# Altium PCB Audio_Meter_V3.2.PcbDoc (part 1 of 4)
Units mil, origin at the board's own origin, x right, y up, seen from the top; angles counter-clockwise.
Board outline 2756.14 x 2519.69 mil, 2 copper layers (Top Layer, Bottom Layer), stack 57 mil thick; 102 components, 57 nets, 306 pads, 131 vias.
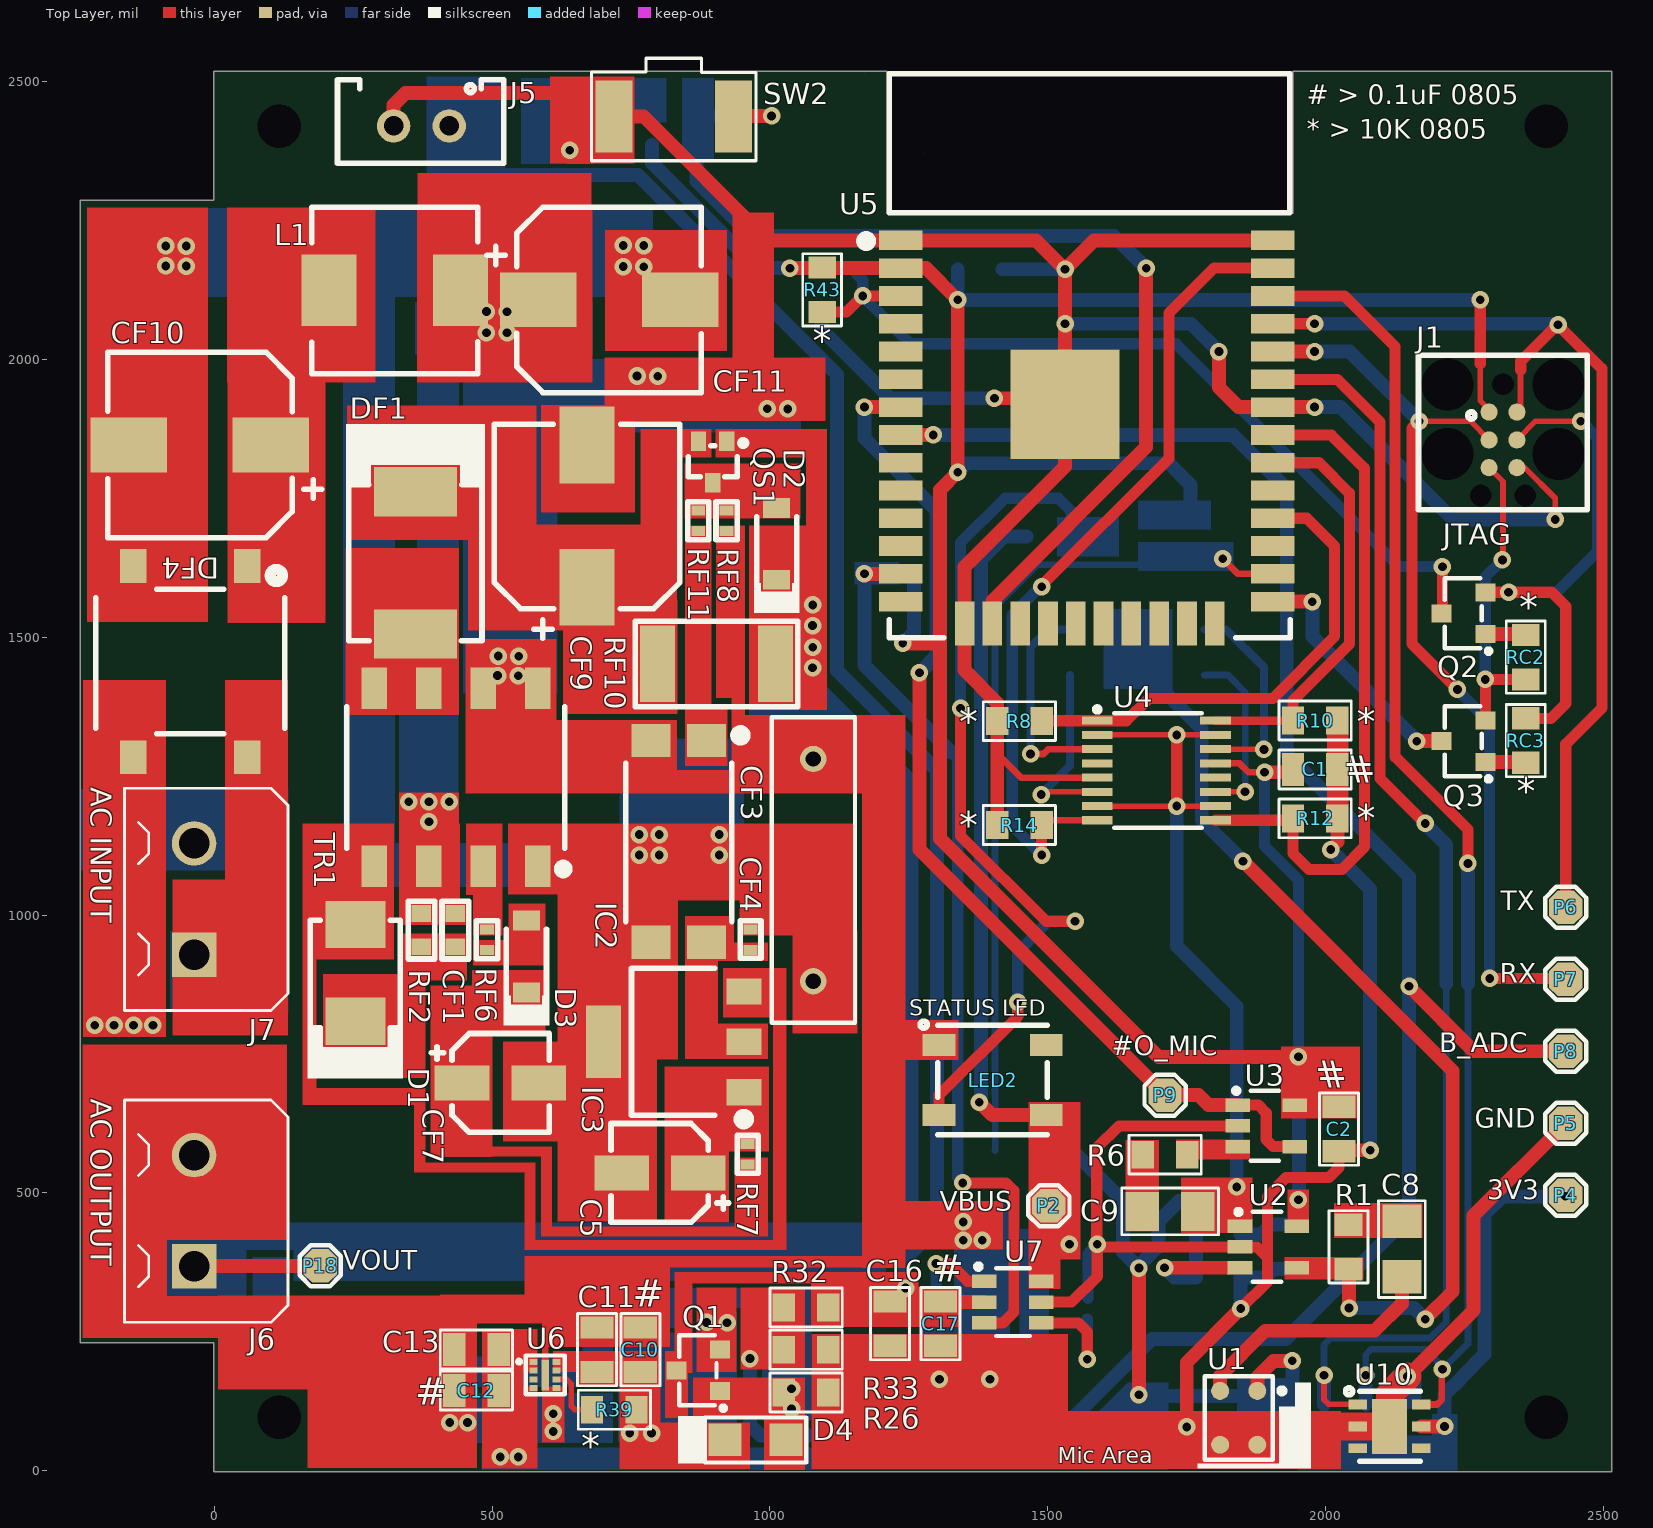
[diagram p0: Top Layer view]
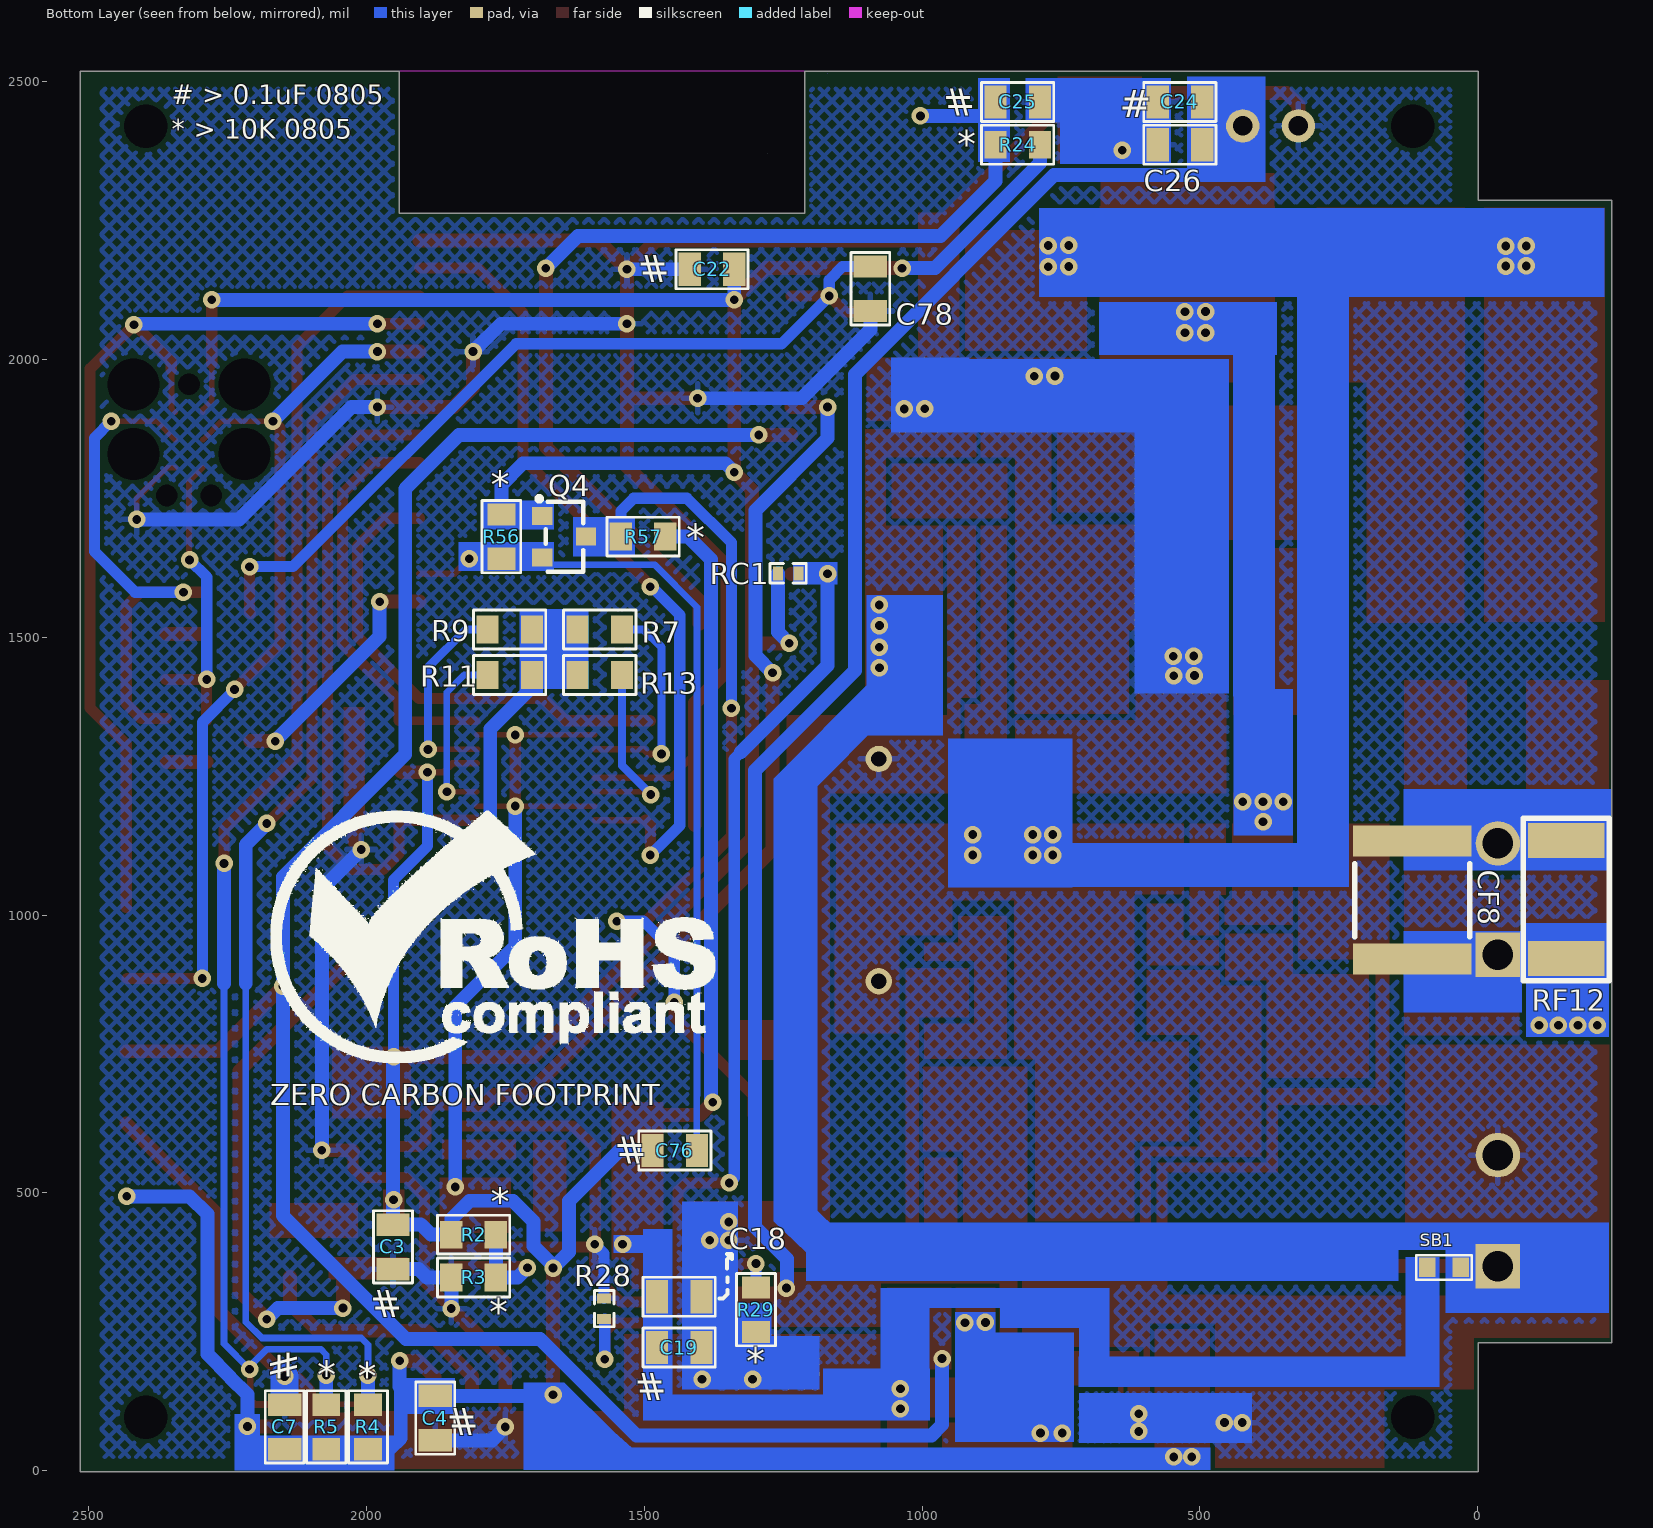
[diagram p1: Bottom Layer view, seen from below]
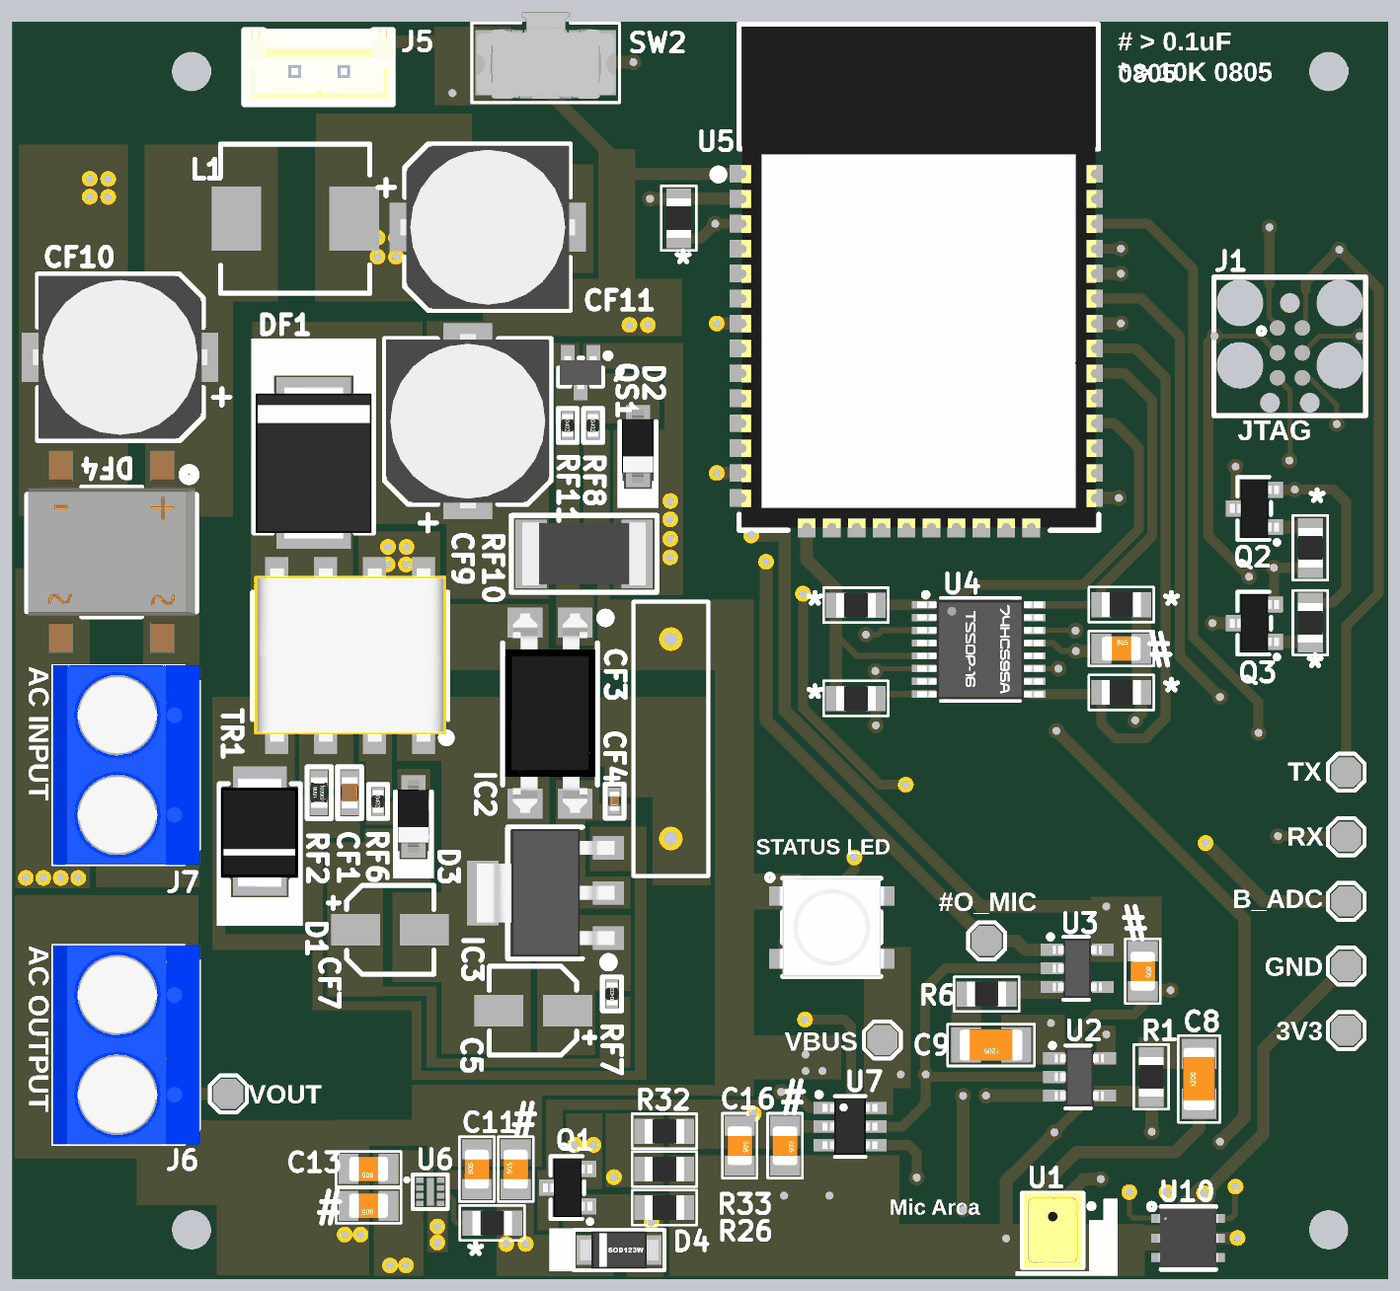
[diagram p3: 3D render of the assembled board from above, using the file's embedded part models]
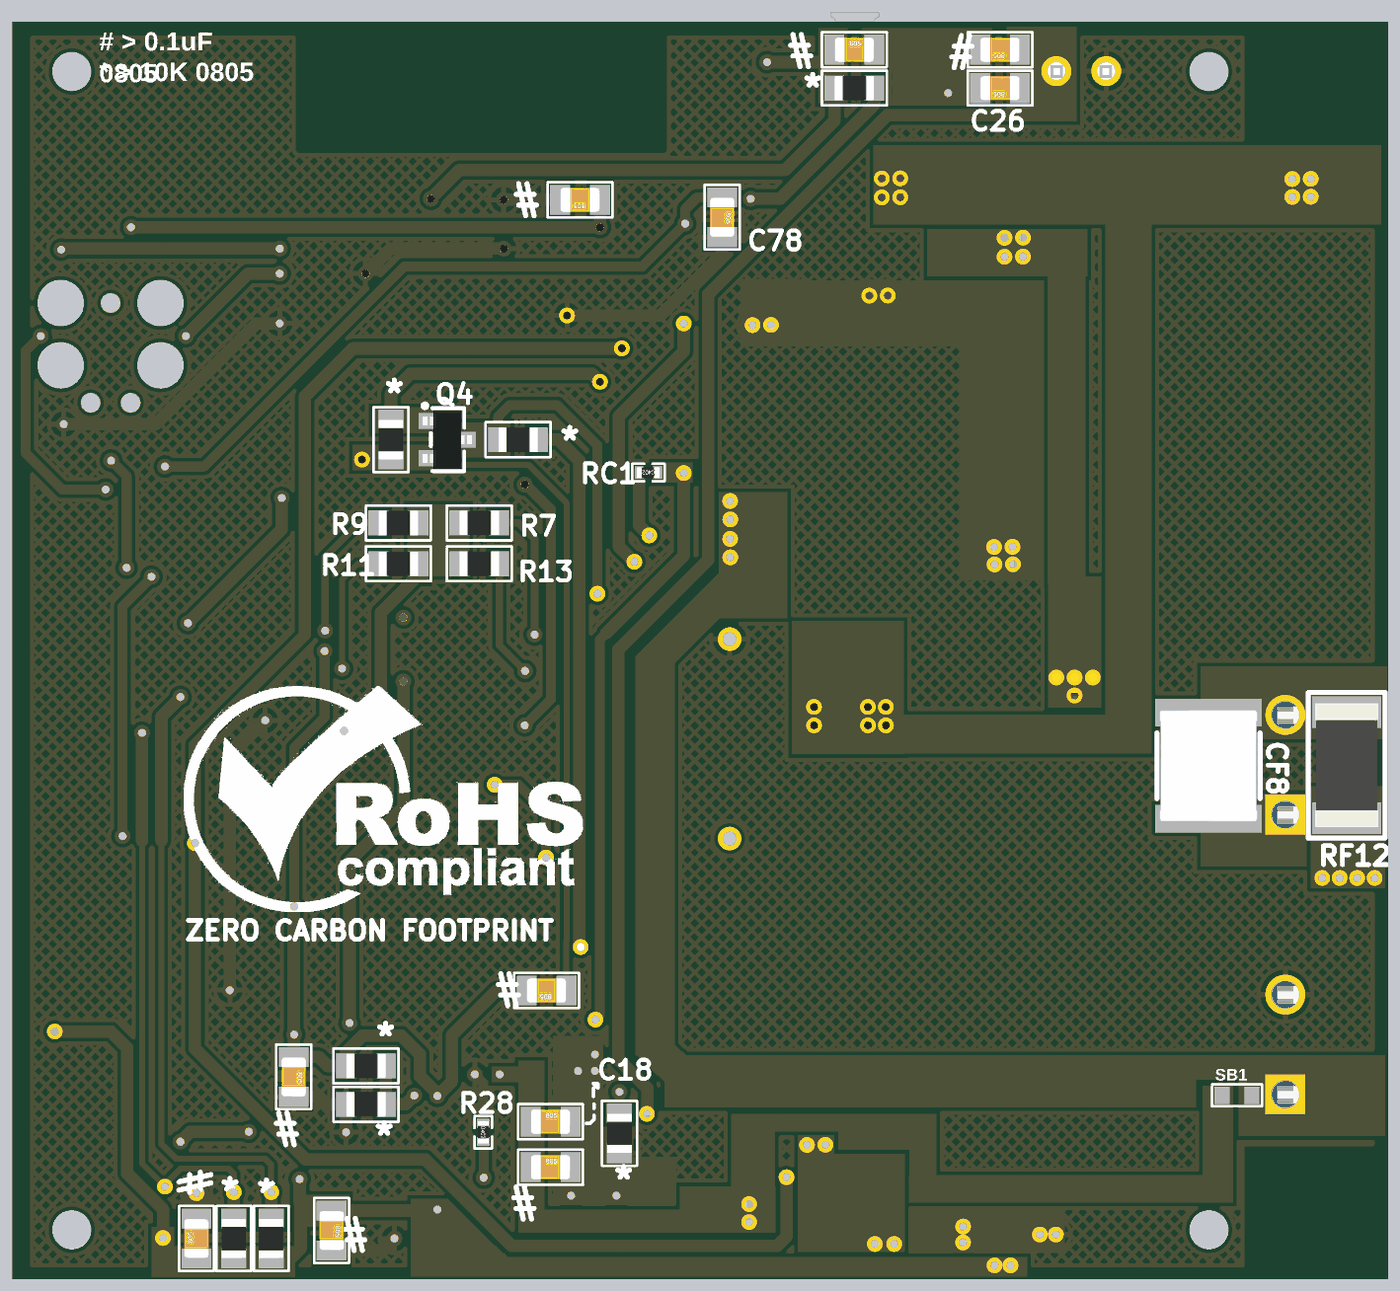
[diagram p4: 3D render of the assembled board from below, using the file's embedded part models]

## Layer stack, top to bottom
Top Solder: solder mask 3, Solder Resist, Dk 3.5
Top Layer: signal copper 10
Dielectric 1: dielectric 37, FR-4, Dk 4.8
Bottom Layer: signal copper 10
Bottom Solder: solder mask 3, Solder Resist, Dk 3.5

## Board outline
-241.16,230.28 -1,230.28 -1,-1.69 2514.98,-1.68 2514.98,2518 1941,2518 1941,2263 1211,2263 1211,2518 -1,2518 -1,2286.03 -241.16,2286.03
cut-out: 1941,2263 1211,2263 1211,2518 1941,2518
cut-out: 1279,2370
cut-out: 1169.36,2514

## Design rules (kind name [scope] priority, off if disabled: settings)
Clearance [All] p1: gap=7 ignorepadtopadclearanceinfootprint=FALSE except(3: Arc-SMDPad Track-SMDPad SMDPad-SMDPad)
HoleSize [All] p1: absolutevalues=TRUE maxlimit=1000 minlimit=1 maxpercent=80.000 minpercent=20.000
HoleToHoleClearance [All] p1: gap=5 allowstackedmicrovias=TRUE
MinimumSolderMaskSliver [All] p1: minsoldermaskwidth=0
PolygonConnect [All] p1: connectstyle=Relief reliefconductorwidth=10 reliefentries=4 polygonreliefangle="90 Angle" airgapwidth=10
RoutingVias [All] p1: holewidth=15.75 width=31.5 viastyle="Through Hole" minholewidth=15.75 minwidth=31.5 maxholewidth=15.75 maxwidth=31.5
SilkToSilkClearance [All] p1: silktosilkclearance=0
SilkToSolderMaskClearance [IsPad] p1: minsilkscreentomaskgap=0 clearancetoexposedcopper=TRUE
SolderMaskExpansion SolderMaskExpansion_1 [IsVia] p1: expansion=4 soldermaskfromhole=TRUE
SolderMaskExpansion [not IsVia] p2: expansion=4
Width [All] p1: maxlimit=50 minlimit=10 preferedwidth=15 minimp=50.000000 maximp=50.000000 favimp=50.000000
25 further rules are at their usual default settings.

## Classes and differential pairs
component class U_SMPS_Section: C5 CF1 CF3 CF4 CF7 CF8 CF9 CF10 CF11 D1 D2 D3 DF1 DF4 IC2 IC3 L1 QS1 RF2 RF6 RF7 RF8 RF10 RF11 RF12 TR1
component class U_Sensor_Section: C7 R4 R5 U10
component class U_Power_Section: C10 C11 C12 C13 D4 LED2 Q1 R26 R39 U6
component class U_Controller_Section: C22 C25 C76 C78 Q2 Q3 Q4 R24 R43 R56 R57 RC2 RC3 SW2 U5
component class U_Connector_Section: C24 C26 J1 J5 J6 J7 P2 P4 P5 P6 P7 P18 SB1
component class "U_Battery Charging_Section": C16 C17 C18 C19 P8 R28 R29 R32 R33 RC1 U7
component class U_Audio_Section: C1 C2 C3 C4 C8 C9 C21 P9 R1 R2 R3 R6 R7 R8 R9 R10 R11 R12 R13 R14 U1 U2 U3 U4

## Components (designator, comment, footprint, x,y, rotation, side; value= is the part's Value field where it differs from the comment)
C1 "0.1uF" Cap0805 1981,1262 r0 top
C2 "0.1uF" Cap0805 2024,615 r270 top
C3 "0.1uF" Cap0805 1952,403 r270 bottom
C4 "0.1uF" Cap0805 1876,95 r270 bottom
C5 "10uF" EEE-1EA100WR 802.1,536 r180 top
C7 "0.1uF" Cap0805 2147,79 r90 bottom
C8 "1206YC105K4T2A" Cap1206 2137,399 r90 top
C9 "1206YC105K4T2A" Cap1206 1720,467 r180 top
C10 "0.1uF" Cap0805 767,218 r90 top
C11 "1uF" Cap0805 689,218 r90 top
C12 "0.1uF" Cap0805 472,144.62 r180 top
C13 "1uF" Cap0805 472,218.5 r180 top
C16 "1uF" Cap0805 1216,265 r270 top
C17 "0.1uF" Cap0805 1307,265 r270 top
C18 "1uF" Cap0805 1437,313.3 r180 bottom
C19 "0.1uF" Cap0805 1437,222 r180 bottom
C22 "0.1uF" Cap0805 1378,2162 r0 bottom
C24 "0.1uF" Cap0805 536,2463 r0 bottom
C25 "0.1uF" Cap0805 828,2463 r180 bottom
C26 "4.7UF" Cap0805 536,2386 r0 bottom
C76 "0.1uF" Cap0805 1445,576.37 r0 bottom
C78 "1uF" Cap0805 1093,2127 r270 bottom
CF1 "1000pF" Cap0603 434,973 r270 top
CF3 "1nF" RAD-0.4 1078,1081 r90 top locked
CF4 "1nF" Cap0402 965,956 r90 top
CF7 "10uF" EEE-1EA100WR 515,698 r0 top
CF8 "4700pF" CAP-2220 118,1027 r90 bottom
CF9 "1000uF" UWT0J102MNL1GS 671,1717.95 r90 top
CF10 "4.7uF" ULR2G4R7MNL1GS -26,1846 r180 top
CF11 "4.7uF" ULR2G4R7MNL1GS 710.95,2107 r0 top
D1 "MURS160T3G" SMB 254,896 r270 top
D2 "MMSZ5229BT1" SOD-123 1012,1668 r270 top
D3 "MMSD4148T1G" SOD-123 562,925.57 r270 top
D4 "PMEG3010ER,115" PMEG3010ER,115 1029.24,56 r180 top
DF1 "MBRS360T3G" SMC 362,1633.95 r90 top
DF4 "DF04S-T" DF04S-T -43,1456 r0 top
IC2 "SFH615A-4X018T" SFH615A-4X018T 836,1132.5 r270 top
IC3 "NCP1014ST100T3G" SOT-223 827,772 r90 top
J1 "TC2030-IDC" TC2030-IDC 2319,1855 r270 top
J5 "B2B-EH-A(LF)(SN)" B2B-EH-A(LF)(SN) 373,2420 r180 top locked
J6 "Terminal Block 2POS" "Terminal Block 2P" -36,368 r90 top locked
J7 "Terminal Block 2POS" "Terminal Block 2P" -36,929 r90 top locked
L1 "820uH" DR74-821-R 325,2124 r0 top
LED2 "1655" 1655 1400.61,703.01 r0 top
P2 "TEST POINT" "TEST POINT" 1502,477 r0 top
P4 "TEST POINT" "TEST POINT" 2432,496 r0 top
P5 "TEST POINT" "TEST POINT" 2432,625.5 r0 top
P6 "TEST POINT" "TEST POINT" 2432,1014 r0 top
P7 "TEST POINT" "TEST POINT" 2432,884.5 r0 top
P8 "TEST POINT" "TEST POINT" 2432,755 r0 top
P9 "TEST POINT" "TEST POINT" 1711,676 r0 top
P18 "TEST POINT" "TEST POINT" 191,369 r270 top
Q1 "DMP2045U-7" SOT-23 871,181 r90 top
Q2 "MMBT2222A-7-F" SOT-23 2248,1543 r90 top
Q3 "MMBT2222A-7-F" SOT-23 2248,1313 r90 top
Q4 "BSS138LT1G" SOT-23 1644,1681 r270 bottom
QS1 "MMBT2907AWT1G" "SC-70-3 (SOT323)" 897,1815.4 r180 top
R1 "1K" RES0805 2041,403 r270 top
R2 "10K" RES0805 1807,425 r0 bottom
R3 "10K" RES0805 1807,348 r0 bottom
R4 "10K" RES0805 1997,79 r270 bottom
R5 "10K" RES0805 2072,79 r270 bottom
R6 "1K" RES0805 1711,569 r180 top
R7 "47K" RES0805 1580,1514 r0 bottom locked
R8 "10K" RES0805 1449,1349 r0 top
R9 "100K" RES0805 1742,1514 r180 bottom locked
R10 "10K" RES0805 1981,1350 r180 top
R11 "220K" RES0805 1742,1432 r180 bottom locked
R12 "10K" RES0805 1981,1174 r180 top
R13 "470K" RES0805 1580,1432 r0 bottom locked
R14 "10K" RES0805 1449,1162 r0 top
R24 "10K" RES0805 828,2386 r180 bottom
R26 "100K" RES0805 1065,141 r180 top
R28 "665R" Res0402 1572,292 r270 bottom
R29 "10K" RES0805 1299,290 r90 bottom
R32 "1M" RES0805 1065,294 r0 top
R33 "1M" RES0805 1065,218 r0 top
R39 "10K" RES0805 720,110 r0 top
R43 "10K" RES0805 1094,2125 r90 top
R56 "10K" RES0805 1757,1681 r270 bottom
R57 "10K" RES0805 1502,1681 r0 bottom
RC1 "10K" Res0402 1241,1615 r0 bottom
RC2 "10K" RES0805 2360,1464 r90 top
RC3 "10K" RES0805 2360,1314 r270 top
RF2 "150K" Res0603 373,973 r90 top
RF6 "10R" Res0402 491,955.5 r270 top
RF7 "2K" Res0402 960,569.5 r90 top
RF8 "200R" Res0402 922,1709.5 r270 top
RF10 "0.62R" "RES 2512" 904,1452 r0 top
RF11 "68R" Res0402 871,1709.5 r270 top
RF12 "18R" "RES 2512" -159,1028 r270 bottom
SB1 "Solder Bridge" "Solder Bridge" 61,366 r180 bottom
SW2 "Switch" KSS221GLFS 827,2437 r180 top locked
TR1 "750311558" 750311558 435,1248 r270 top
U1 "SPU0410HR5H-PB" SPU0410HR5H-PB 1810.07,144 r0 top locked
U2 "OPA344NA/250" SOT23-5 1897,403 r0 top
U3 "OPA344NA/250" SOT23-5 1893,620.86 r0 top
U4 "ADG712BRUZ-REEL" 16-TSSOP 1698.3,1260.23 r0 top
U5 "ESP32-WROOM-32 (16MB)" "ESP32-WROOM-32 (16MB)" 1570,1869.31 r0 top locked
U6 "NCP186AMX330TAG" NCP186AMX330TAG 595.67,172.62 r0 top
U7 "BQ21040DBVR" SOT-23-6 1437,303.6 r0 top
U10 "SI7021-A20-GM1R" SI7021-A20-GM1R 2115.09,80 r0 top

## Footprints (in the part's own frame and the unit in brackets; to place one, negate y for a bottom-side part, rotate by r counter-clockwise, add the part's x,y. Pads: shape width x height; smd on the part's side, far side on the other; paste and mask are expansions set on the pad)
16-TSSOP [mm]
  rect 1.4x0.37 smd: 1(-2.775,2.275) 2(-2.775,1.625) 3(-2.775,0.975) 4(-2.775,0.325) 5(-2.775,-0.325) 6(-2.775,-0.975) 7(-2.775,-1.625) 8(-2.775,-2.275) 9(2.625,-2.275) 10(2.625,-1.625) 11(2.625,-0.975) 12(2.625,-0.325) 13(2.625,0.325) 14(2.625,0.975) 15(2.625,1.625) 16(2.625,2.275)
  silkscreen extent -2.89,-2.62 2.01,2.9, body extent -3.2,-2.55 3.2,2.55, height 1.2
1655 [mm]
  rect 1.5x1 smd: 1(-2.45,1.6) 2(-2.45,-1.6) 3(2.45,-1.6) 4(2.45,1.6)
  silkscreen extent -3.31,-2.5 2.5,2.7, body extent -2.7,-2.5 2.7,2.5, height 1.58
750311558 [mm]
  rect 1.91x1.17 smd: 1(4.065,3.735) 2(4.065,1.245) 3(4.065,-1.245) 4(4.065,-3.735) 5(-4.065,-3.735) 6(-4.065,-1.245) 7(-4.065,1.245) 8(-4.065,3.735)
  silkscreen extent -3.23,-4.98 4.37,5.08, body extent -4.42,-4.88 4.38,4.9, height 10.09
B2B-EH-A(LF)(SN) [mil]
  round 60 hole 35.43: 1(-50,0) 2(50,0)
  silkscreen extent -148,-83 151,67, body extent -148,-86 148,64, height 244
Cap0402 [mil]
  rect 18x25 smd: 1(-18.5,0) 2(18.5,0)
  silkscreen extent -34,-19 34,19, body extent -20,-10 20,10, height 19
Cap0603 [mil]
  rect 30x35 smd: 1(30,0) 2(-30,0)
  silkscreen extent -52,-24 52,24, body extent -31,-16 32,16, height 34
Cap0805 [mil] "SMD 0805"
  rect 40x60 smd: 1(-40,0) 2(40,0)
  silkscreen extent -65,-35 65,35, body extent -39,-25 39,25, height 30
Cap1206 [mil] "SMD 1206"
  rect 60x70 smd: 1(-50,0) 2(50,0)
  silkscreen extent -87,-42 87,42, body extent -63,-31 63,32, height 39
CAP-2220 [mm]
  rect 1.41x5.41 smd: 1(-2.699,0) 2(2.699,0)
  silkscreen extent -1.67,-2.62 1.67,2.62, body extent -2.85,-2.5 2.85,2.5, height 2
DF04S-T [mm]
  rect 1.22x1.54 smd: 1(2.6,4.37) 2(2.6,-4.37) 3(-2.6,4.37) 4(-2.6,-4.37)
  silkscreen extent -4.32,-3.3 4.32,4.22, body extent -4.25,-5.15 4.26,5.15, height 3.55
DR74-821-R [mm]
  rect 2.52x3.27 smd: 1(-3,0) 2(3,0)
  silkscreen extent -3.8,-3.8 3.8,3.8
EEE-1EA100WR [mm]
  rect 2.5x1.6 smd: 1(-1.75,0) 2(1.75,0)
  silkscreen extent -3.15,-2.26 2.24,2.26, body extent -2.5,-2.15 2.5,2.15, height 5.8
"ESP32-WROOM-32 (16MB)" [mm]
  rect 2x0.9 smd: 1(-8.5,8.755) 2(-8.5,7.485) 3(-8.5,6.215) 4(-8.5,4.945) 5(-8.5,3.675) 6(-8.5,2.405) 7(-8.5,1.135) 8(-8.5,-0.135) 9(-8.5,-1.405) 10(-8.5,-2.675) 11(-8.5,-3.945) 12(-8.5,-5.215) 13(-8.5,-6.485) 14(-8.5,-7.755) 25(8.5,-7.755) 26(8.5,-6.485) 27(8.5,-5.215) 28(8.5,-3.945) 29(8.5,-2.675) 30(8.5,-1.405) 31(8.5,-0.135) 32(8.5,1.135) 33(8.5,2.405) 34(8.5,3.675) 35(8.5,4.945) 36(8.5,6.215) 37(8.5,7.485) 38(8.5,8.755)
  rect 0.9x2 smd: 15(-5.58,-8.755) 16(-4.31,-8.755) 17(-3.04,-8.755) 18(-1.77,-8.755) 19(-0.5,-8.755) 20(0.77,-8.755) 21(2.04,-8.755) 22(3.31,-8.755) 23(4.58,-8.755) 24(5.85,-8.755)
  rect 5x5 smd: 39(-0.991,1.27)
  silkscreen extent -10.28,-9.4 9.3,16.38, body extent -8.91,-9.3 9.16,16.24, height 3.01
KSS221GLFS [mil] "Tactile Switch SPST-NO Side Actuated Surface Mount, Right Angle"
  rect 66.93x130 smd: 1(-107.3,0) 2(107.3,0)
  silkscreen extent -148,-105 148,80, body extent -138,-101 138,72, height 65
NCP186AMX330TAG [mm]
  rect 0.37x0.28 smd: 1(-0.525,0.6) 2(-0.525,0.2) 3(-0.525,-0.2) 4(-0.525,-0.6) 5(0.525,-0.6) 6(0.525,-0.2) 7(0.525,0.2) 8(0.525,0.6)
  rect 0.35x1.4 smd: 9(0,0)
  silkscreen extent -1.27,-0.89 0.89,0.89
PMEG3010ER,115 [mm] "DIODE SCHOTTKY 30V 1A SOD123W"
  rect 1.5x1.5 smd: A(0,0) K(2.8,0)
  silkscreen extent -0.91,-1.09 4.95,1.09, body extent -0.6,-0.95 3.4,0.95, height 1.1
RAD-0.4 [mm] "Radial Cap, Thru-Hole; 2 Leads; 0.4 in Pin Spacing"
  round 1.2 hole 0.7: 1(-5.08,0) 2(5.08,0)
  silkscreen extent -6.98,-1.91 6.98,1.91
Res0402 [mil]
  rect 18x25 smd: 1(-18.5,0) 2(18.5,0)
  silkscreen extent -32,-18 32,18, body extent -23,-11 23,11, height 16
Res0603 [mil]
  rect 30x35 smd: 1(30,0) 2(-30,0)
  silkscreen extent -52,-24 52,24, body extent -31,-17 31,17, height 18
RES0805 [mil] "Resistor-SMD-0805"
  rect 40x50 smd: 1(-40,0) 2(40,0)
  silkscreen extent -65,-35 65,35, body extent -39,-25 39,24, height 24
"RES 2512" [mm] "RES SMD (2512)"
  rect 1.6x3.5 smd: 1(-2.7,0) 2(2.7,0)
  silkscreen extent -3.71,-1.96 3.71,1.96, body extent -3.15,-1.6 3.15,1.6, height 0.71
"SC-70-3 (SOT323)" [mm]
  rect 0.7x0.9 smd: 1(-0.65,-0.95) 2(0.65,-0.95) 3(0,0.95)
  silkscreen extent -1.42,-0.89 1.12,0.69, body extent -1.05,-1.05 1.05,1.05, height 0.88
SFH615A-4X018T [mm]
  rect 1.52x1.78 smd: 1(-4.61,1.27) 2(-4.61,-1.27) 3(4.61,-1.27) 4(4.61,1.27)
  silkscreen extent -5.07,-2.41 3.66,3.04, body extent -5.08,-2.3 5.08,2.3, height 3.84
SI7021-A20-GM1R [mm]
  rect 0.85x0.45 smd: 1(-1.45,1) 2(-1.45,0) 3(-1.45,-1) 4(1.45,-1) 5(1.45,0) 6(1.45,1)
  rect 1.6x2.5 smd: 7(0,0)
  silkscreen extent -2.02,-1.6 1.4,1.76, body extent -1.5,-1.5 1.5,1.5, height 1.22
SMB [mil]
  rect 85x107.99 smd: 1(-87.01,0) 2(87.01,0)
  silkscreen extent -95,-86 190,86, body extent -107,-78 113,77, height 96
SMC [mm]
  rect 2.25x3.79 smd: 1(-3.25,0) 2(3.25,0)
  silkscreen extent -3.56,-3.18 6.35,3.17, body extent -3.9,-2.95 3.9,2.95, height 2.4
SOD-123 [mm]
  rect 0.91x1.22 smd: 1(-1.64,0) 2(1.64,0)
  silkscreen extent -1.24,-1.04 3.15,1.04, body extent -1.85,-0.8 1.85,0.8, height 1.27
"Solder Bridge" [mil] "Solder Bridge ON"
  rect 30x35 smd: 1(-30,0) 2(30,0)
  silkscreen extent -50,-22 50,22
SOT23-5 [mm] "SOT23-5 Package"
  rect 1.12x0.62 smd: 1(-1.3,0.95) 2(-1.3,0) 3(-1.3,-0.95) 4(1.3,-0.95) 5(1.3,0.95)
  silkscreen extent -1.48,-1.6 0.58,1.71, body extent -1.25,-1.5 1.25,1.5, height 1.09
SOT-23 [mm]
  rect 0.82x0.92 smd: 1(-0.95,-1) 2(0.95,-1) 3(0,1)
  silkscreen extent -1.82,-1.23 1.6,0.86, body extent -1.5,-1.25 1.5,1.25, height 1.1
SOT-23-6 [mm]
  rect 1.12x0.62 smd: 1(-1.3,0.95) 2(-1.3,0) 3(-1.3,-0.95) 4(1.3,-0.95) 5(1.3,0) 6(1.3,0.95)
  silkscreen extent -1.69,-1.55 0.79,1.74, body extent -1.4,-1.45 1.4,1.45, height 1.42
SOT-223 [mm]
  rect 1.2x1.6 smd: 1(-2.3,-3.2) 2(0,-3.2) 3(2.3,-3.2)
  rect 3.3x1.6 smd: 4(0,3.2)
  silkscreen extent -3.75,-3.42 3.35,1.93, body extent -3.25,-3.5 3.25,3.5, height 1.62
SPU0410HR5H-PB [mm]
  round 0.82 smd: 1(1.7,0) 2(1.7,-2.46) 3(0,-2.46) 4(0,0)
  silkscreen extent -0.71,-3.15 2.95,0.67, body extent -0.62,-3.11 2.33,0.65, height 1.03
TC2030-IDC [mm] "CABLE ADAPTER 6 POS"
  round 0.787 smd: 1(-1.27,-0.635) 1(-1.27,-0.635) 2(-1.27,0.635) 3(0,-0.635) 4(0,0.635) 5(1.27,-0.635) 6(1.27,0.635)
  round 0 hole 2.375 unplated: MP1(-2.54,-2.54) MP2(0.635,-2.54) MP3(0.635,2.54) MP4(-2.54,2.54)
  round 0 hole 0.991: MP5(-2.54,0) MP6(2.54,-1.016) MP7(2.54,1.016)
  silkscreen extent -3.86,-3.86 3.2,3.86
"Terminal Block 2P" [mil] "TERMINAL BLOCK 2POS 5.08MM SIDE"
  rect 80x80 hole 55: 1(0,0)
  round 80 hole 55: 2(200,0)
  silkscreen extent -101,-169 299,125, body extent -101,-170 299,125, height 394
"TEST POINT" [mil]
  oct 60x60 smd: 1(0,0)
  silkscreen extent -37,-37 37,37
ULR2G4R7MNL1GS [mm]
  rect 3.5x2.5 smd: 1(-3.25,0) 2(3.25,0)
  silkscreen extent -5.59,-4.24 4.2,4.24, body extent -4.44,-4.15 4.45,4.15, height 10.06
UWT0J102MNL1GS [mm]
  rect 3.5x2.5 smd: 1(-3.25,0) 2(3.25,0)
  silkscreen extent -5.59,-4.24 4.2,4.24, body extent -4.44,-4.15 4.45,4.15, height 10.06

## Part data
C1 C2 C3 C4 C7 C10 C12 C17 C19 C22 C24 C25 C76: library part CL21F104ZBCNNNC, "CAP CER 0.1UF 50V Y5V 0805", Capacitance=100nF, Case/Package=0805, Case Code (Metric)=2012, Dielectric=Y5V, Manufacturer=Samsung, Max Operating Temperature=85°C, Min Operating Temperature=-30°C, Package Quantity=1, Supplier Part Number 1=1276-1007-6-ND, Tolerance=80%, Voltage Rating=50V, Case Code (Imperial)=0805, ComponentLink1Description=https://media.digikey.com/pdf/Data%20Sheets/Samsung%20PDFs/CL_Series_MLCC_ds.pdf?src-supplier=Digi-Key, ComponentLink1URL=https://media.digikey.com/pdf/Data%20Sheets/Samsung%20PDFs/CL_Series_MLCC_ds.pdf?src-supplier=Digi-Key, Depth=1.25mm, Height=0.85mm, Length=2mm, Manufacturer Part Number=CL21F104ZBCNNNC, Material=Ceramic, Mount="Surface Mount", Packaging="Tape and Reel", Pricing 1="1=0.1, 10=0.044, 100=0.0195, 500=0.0139, 1000=0.01092 (USD)", Radiation Hardening=No, Stock 1=4901061, Supplier 1=Digi-Key, Thickness=0.037inch, Width=0.049inch
C5 CF7: library part EEE-1EA100WR, "CAP ALUM 10UF 20% 25V SMD", Case/Package=Radial, Manufacturer=Panasonic, Max Operating Temperature=85°C, Min Operating Temperature=-40°C, Package Quantity=1, Ripple Current=22mA, Supplier Part Number 1=PCE3895CT-ND, Tolerance=20%, Voltage Rating=25V, Capacitance=10uF, Category="Aluminum Electrolytic Capacitors", ComponentLink1Description=https://datasheet.ciiva.com/2985/aba0000ce2-2985106.pdf?src-supplier=Avnet, ComponentLink1URL=https://datasheet.ciiva.com/2985/aba0000ce2-2985106.pdf?src-supplier=Avnet, ComponentLink2Description=https://datasheet.ciiva.com/17536/aba0000ce2-17536886.pdf?src-supplier=Avnet+Europe, ComponentLink2URL=https://datasheet.ciiva.com/17536/aba0000ce2-17536886.pdf?src-supplier=Avnet+Europe, ComponentLink3Description=https://datasheet.ciiva.com/16201/aba0000ce2-16201870.pdf?src-supplier=Future+Electronics, ComponentLink3URL=https://datasheet.ciiva.com/16201/aba0000ce2-16201870.pdf?src-supplier=Future+Electronics, Contact Plating=Tin, Diameter=4mm, Height=5.4mm, Height - Seated (Max)=0.213inch, Lead Free="Lead Free", Length=5.5mm, Life (Hours)=2000Hour, Manufacturer Part Number=EEE-1EA100WR, Mount="Surface Mount,PCB", Packaging="Tape and Reel", Polarity=Polar, Pricing 1="1=0.29000, 10=0.19700, 50=0.13160, 100=0.11190, 500=0.07896, 1000=0.06909 (USD)", Radiation Hardening=No, REACH SVHC=Unknown, Ripple Current (AC)=22mA, RoHS=Yes, Stock 1=20392, Supplier 1=Digi-Key, Termination=SMD/SMT, Voltage Rating (DC)=25V
C8 C9: "CAP CER 1UF 16V X7R 1206", Capacitance=1uF, Case/Package=1206, Case Code (Metric)=3216, Dielectric=X7R, Manufacturer="Kyocera AVX", Max Operating Temperature=125°C, Min Operating Temperature=-55°C, Package Quantity=2000, Ratings=AEC-Q200, Supplier Part Number 1=478-10899-1-ND, Tolerance=10%, Voltage Rating=16V, Case Code (Imperial)=1206, ComponentLink1Description=http://www.mouser.com/ds/2/40/AutoMLCC-777028.pdf?src-supplier=Mouser, ComponentLink1URL=http://www.mouser.com/ds/2/40/AutoMLCC-777028.pdf?src-supplier=Mouser, ComponentLink2Description=http://www.avxcorp.com/docs/Catalogs/cauto.pdf?src-supplier=Avnet, ComponentLink2URL=http://www.avxcorp.com/docs/Catalogs/cauto.pdf?src-supplier=Avnet, ComponentLink3Description=http://www.avx.com/docs/Catalogs/cauto.pdf?src-supplier=Future+Electronics, ComponentLink3URL=http://www.avx.com/docs/Catalogs/cauto.pdf?src-supplier=Future+Electronics, ComponentLink4Description=http://www.avx.com/docs/Catalogs/cx7r.pdf?src-supplier=Digi-Key, ComponentLink4URL=http://www.avx.com/docs/Catalogs/cx7r.pdf?src-supplier=Digi-Key, Depth=1.6mm, Lead Free="Lead Free", Length=3.2mm, Manufacturer Part Number=1206YC105K4T2A, Mount="Surface Mount", Packaging="Tape and Reel", Pricing 1="1=0.41, 10=0.285, 100=0.1708, 500=0.12808, 1000=0.10816 (USD)", Radiation Hardening=No, Stock 1=1895, Supplier 1=Digi-Key, Termination=SMD/SMT, Thickness=0.037inch, Voltage Rating (DC)=16V, Width=1.6mm
C11 C13 C16 C18 C78: library part CL21B105KOFNNNG, "CAP CER 1UF 16V X7R 0805", Case/Package=0805, Case Code (Metric)=2012, Dielectric=X7R, Manufacturer=Samsung, Max Operating Temperature=125°C, Min Operating Temperature=-55°C, Package Quantity=3000, Supplier Part Number 1=1276-6471-6-ND, Tolerance=10%, Voltage=16V, Capacitance=1uF, Case Code (Imperial)=0805, ComponentLink1Description=http://www.samsungsem.com/global/support/library/product-catalog/__icsFiles/afieldfile/2014/11/13/MLCC.pdf?src-supplier=Digi-Key, ComponentLink1URL=http://www.samsungsem.com/global/support/library/product-catalog/__icsFiles/afieldfile/2014/11/13/MLCC.pdf?src-supplier=Digi-Key, ComponentLink2Description=http://www1.futureelectronics.com/doc/SAMSUNG%20PASSIVE/CL05B104KQ5NNNC.pdf?src-supplier=Future+Electronics, ComponentLink2URL=http://www1.futureelectronics.com/doc/SAMSUNG%20PASSIVE/CL05B104KQ5NNNC.pdf?src-supplier=Future+Electronics, ComponentLink3Description=https://www.distrelec.biz/Web/Downloads/_e/ng/MLCC_CatalogDownload2013_ENG.pdf?mime=application%2Fpdf&src-supplier=Distrelec, ComponentLink3URL=https://www.distrelec.biz/Web/Downloads/_e/ng/MLCC_CatalogDownload2013_ENG.pdf?mime=application%2Fpdf&src-supplier=Distrelec, ComponentLink4Description=https://produktinfo.conrad.com/datenblaetter/450000-474999/455935-da-01-en-VS_KONDENSATOR_0805.pdf?src-supplier=Conrad, ComponentLink4URL=https://produktinfo.conrad.com/datenblaetter/450000-474999/455935-da-01-en-VS_KONDENSATOR_0805.pdf?src-supplier=Conrad, Depth=1.25mm, Height=1.25mm, Lead Free="Lead Free", Length=2mm, Manufacturer Part Number=CL21B105KOFNNNG, Material=Ceramic, Mount="Surface Mount", Packaging="Tape and Reel", Pricing 1="1=0.1, 10=0.047, 100=0.0211, 500=0.01508, 1000=0.01185 (USD)", Stock 1=507348, Supplier 1=Digi-Key, Thickness=0.053inch, Voltage Rating=16V, Width=0.049inch
C26: library part C0805C475K4PACTU, "CAP CER 4.7UF 16V 10% X5R 0805", Capacitance=4.7uF, Case/Package=0805, Dielectric=X5R, Dielectric Material=Ceramic, Manufacturer=KEMET, Max Operating Temperature=85°C, Min Operating Temperature=-55°C, Supplier Part Number 1=36X2756, Tolerance=10%, Voltage=16V, ComponentLink1Description=http://www.samsungsem.com/global/support/library/product-catalog/__icsFiles/afieldfile/2014/11/13/MLCC.pdf?src-supplier=Digi-Key, ComponentLink1URL=http://www.samsungsem.com/global/support/library/product-catalog/__icsFiles/afieldfile/2014/11/13/MLCC.pdf?src-supplier=Digi-Key, ComponentLink2Description=http://www1.futureelectronics.com/doc/SAMSUNG%20PASSIVE/CL05B104KQ5NNNC.pdf?src-supplier=Future+Electronics, ComponentLink2URL=http://www1.futureelectronics.com/doc/SAMSUNG%20PASSIVE/CL05B104KQ5NNNC.pdf?src-supplier=Future+Electronics, ComponentLink3Description=https://www.distrelec.biz/Web/Downloads/_e/ng/MLCC_CatalogDownload2013_ENG.pdf?mime=application%2Fpdf&src-supplier=Distrelec, ComponentLink3URL=https://www.distrelec.biz/Web/Downloads/_e/ng/MLCC_CatalogDownload2013_ENG.pdf?mime=application%2Fpdf&src-supplier=Distrelec, ComponentLink4Description=https://produktinfo.conrad.com/datenblaetter/450000-474999/455935-da-01-en-VS_KONDENSATOR_0805.pdf?src-supplier=Conrad, ComponentLink4URL=https://produktinfo.conrad.com/datenblaetter/450000-474999/455935-da-01-en-VS_KONDENSATOR_0805.pdf?src-supplier=Conrad, ComponentLink5Description=http://capacitoredge.kemet.com/capedge2/DataSheet?pn=C0805C475K4PAC7800&src-supplier=Avnet+Europe, ComponentLink5URL=http://capacitoredge.kemet.com/capedge2/DataSheet?pn=C0805C475K4PAC7800&src-supplier=Avnet+Europe, ComponentLink6Description=https://www.verical.com/server-webapp/html/getDatasheet?partID=319476&src-supplier=Verical, ComponentLink6URL=https://www.verical.com/server-webapp/html/getDatasheet?partID=319476&src-supplier=Verical, Depth=1.25mm, Height=1.25mm, Lead Free="Lead Free", Length=2mm, Manufacturer Part Number=C0805C475K4PACTU, Mount="Surface Mount", Packaging="Tape and Reel", Pricing 1="1=0.142, 2500=0.14, 5000=0.139, 10000=0.137 (USD)", Radiation Hardening=No, Stock 1=22500, Supplier 1=Newark, Termination=SMD/SMT, Voltage Rating (DC)=16V
CF1: library part C0603W102KDRACAUTO, "CAP CER 1000PF 1KV X7R 0603", Manufacturer=KEMET, Supplier Part Number 1=399-C0603W102KDRACAUTOCT-ND, Category="Ceramic Capacitors", Manufacturer Part Number=C0603W102KDRACAUTO, Pricing 1="1=0.49000, 10=0.34600, 50=0.26180, 100=0.22790, 500=0.16884, 1000=0.14351 (USD)", RoHS=No, Stock 1=2355, Supplier 1=Digi-Key
CF3: library part MPX12W1100FA00MSSD, "CAP FILM 1000PF 20% 300VAC RAD", Case/Package=Radial, Manufacturer=WIMA, Max Operating Temperature=110°C, Min Operating Temperature=-40°C, Supplier Part Number 1=1928-1798-ND, Tolerance=20%, Capacitance=1nF, Category=Uncategorized, ComponentLink1Description=https://datasheet.ciiva.com/15164/getdatasheetpartid-658504-15164312.pdf?src-supplier=Verical, ComponentLink1URL=https://datasheet.ciiva.com/15164/getdatasheetpartid-658504-15164312.pdf?src-supplier=Verical, Depth=4mm, Lead Diameter=0.6mm, Lead Pitch=10mm, Length=13.5mm, Manufacturer Part Number=MPX12W1100FA00MSSD, Packaging=Bulk, Pricing 1="1=0.74000, 10=0.54300, 100=0.37250, 500=0.29488, 1000=0.24832, 2500=0.23280, 5000=0.21728 (USD)", Radiation Hardening=No, RoHS=Yes, Stock 1=964, Supplier 1=Digi-Key
CF4: library part GRM155R72A102KA01D, "CAP CER 1000PF 100V X7R 0402", Case/Package=0402, Case Code (Metric)=1005, Dielectric=X7R, Manufacturer=Murata, Max Operating Temperature=125°C, Min Operating Temperature=-55°C, Package Quantity=10000, Supplier Part Number 1=490-6366-1-ND, Tolerance=10%, Voltage=100V, Capacitance=1nF, Case Code (Imperial)=0402, Category="Ceramic Capacitors", ComponentLink1Description=https://datasheet.ciiva.com/18184/getdatasheetpartid-223878-18184773.pdf?src-supplier=Verical, ComponentLink1URL=https://datasheet.ciiva.com/18184/getdatasheetpartid-223878-18184773.pdf?src-supplier=Verical, ComponentLink2Description=https://datasheet.ciiva.com/11621/product-11621687.pdf?src-supplier=Avnet, ComponentLink2URL=https://datasheet.ciiva.com/11621/product-11621687.pdf?src-supplier=Avnet, ComponentLink3Description=https://datasheet.ciiva.com/6270/partnumbering-e-01-6270792.pdf?src-supplier=Digi-Key, ComponentLink3URL=https://datasheet.ciiva.com/6270/partnumbering-e-01-6270792.pdf?src-supplier=Digi-Key, ComponentLink4Description=https://datasheet.ciiva.com/6270/partnumbering-e-01-6270796.pdf?src-supplier=Digi-Key, ComponentLink4URL=https://datasheet.ciiva.com/6270/partnumbering-e-01-6270796.pdf?src-supplier=Digi-Key, ComponentLink5Description=https://datasheet.ciiva.com/6270/partnumbering-e-01-6270798.pdf?src-supplier=Digi-Key, ComponentLink5URL=https://datasheet.ciiva.com/6270/partnumbering-e-01-6270798.pdf?src-supplier=Digi-Key, Depth=0.5mm, Height=0.5mm, Lead Free="Lead Free", Length=1mm, Manufacturer Part Number=GRM155R72A102KA01D, Material=Ceramic, Mount="Surface Mount", Packaging="Tape and Reel", Pricing 1="1=0.10000, 10=0.04700, 50=0.02540, 100=0.02080, 500=0.01486, 1000=0.01168, 2500=0.01062, 5000=0.00977 (USD)", Radiation Hardening=No, REACH SVHC="No SVHC", RoHS=Yes, Stock 1=565854, Supplier 1=Digi-Key, Termination=SMD/SMT, Thickness=0.022inch, Voltage Rating=100V, Voltage Rating (DC)=100V, Width=0.5mm
CF8: library part GA355DR7GF472KW01L, "CAP CER 4700PF 250VAC X7R 2220", Capacitance=4.7nF, Case/Package=2220, Case Code (Metric)=5750, Dielectric=X7R, Manufacturer=Murata, Max Operating Temperature=125°C, Min Operating Temperature=-55°C, Package Quantity=1, Supplier Part Number 1=490-3482-1-ND, Tolerance=10%, Voltage=250V, Case Code (Imperial)=2220, Category="Ceramic Capacitors", ComponentLink1Description=https://datasheet.ciiva.com/11787/0900766b80936815-11787945.pdf?src-supplier=RSComponents, ComponentLink1URL=https://datasheet.ciiva.com/11787/0900766b80936815-11787945.pdf?src-supplier=RSComponents, ComponentLink2Description=https://datasheet.ciiva.com/18183/getdatasheetpartid-104333-18183450.pdf?src-supplier=Verical, ComponentLink2URL=https://datasheet.ciiva.com/18183/getdatasheetpartid-104333-18183450.pdf?src-supplier=Verical, ComponentLink3Description=https://datasheet.ciiva.com/142/partnumbering-e-01-142630.pdf?src-supplier=Digi-Key, ComponentLink3URL=https://datasheet.ciiva.com/142/partnumbering-e-01-142630.pdf?src-supplier=Digi-Key, ComponentLink4Description=https://datasheet.ciiva.com/142/partnumbering-e-01-142631.pdf?src-supplier=Digi-Key, ComponentLink4URL=https://datasheet.ciiva.com/142/partnumbering-e-01-142631.pdf?src-supplier=Digi-Key, ComponentLink5Description=https://datasheet.ciiva.com/142/partnumbering-e-01-142632.pdf?src-supplier=Digi-Key, ComponentLink5URL=https://datasheet.ciiva.com/142/partnumbering-e-01-142632.pdf?src-supplier=Digi-Key, ComponentLink6Description=https://datasheet.ciiva.com/22698/1889704-22698361.pdf?src-supplier=Element14, ComponentLink6URL=https://datasheet.ciiva.com/22698/1889704-22698361.pdf?src-supplier=Element14, ComponentLink7Description=https://datasheet.ciiva.com/41649/1506175-41649338.pdf?src-supplier=Farnell, ComponentLink7URL=https://datasheet.ciiva.com/41649/1506175-41649338.pdf?src-supplier=Farnell, ComponentLink8Description=https://datasheet.ciiva.com/7937/c02e-7937503.pdf?src-supplier=Element14, ComponentLink8URL=https://datasheet.ciiva.com/7937/c02e-7937503.pdf?src-supplier=Element14, ComponentLink9Description=https://datasheet.ciiva.com/14104/inga3-14104127.pdf?src-supplier=Distrelec, ComponentLink9URL=https://datasheet.ciiva.com/14104/inga3-14104127.pdf?src-supplier=Distrelec, Depth=5mm, Height=2mm, Lead Free="Lead Free", Length=5.7mm, Manufacturer Part Number=GA355DR7GF472KW01L, Mount="Surface Mount", Number of Pins=2, Packaging="Tape and Reel", Pricing 1="1=1.49000, 10=1.17500, 50=1.01800, 100=0.88090, 500=0.66556 (USD)", Radiation Hardening=No, REACH SVHC="No SVHC", RoHS=Yes, Stock 1=46734, Supplier 1=Digi-Key, Termination=SMD/SMT, Thickness=0.079inch, Voltage Rating=250V, Voltage Rating (AC)=250V, Voltage Rating (DC)=250V, Width=0.197inch
CF9: library part UWT0J102MNL1GS, "CAP ALUM 1000UF 20% 6.3V SMD", Capacitance=1mF, Case/Package=Radial, Dielectric Material=Aluminium, Leakage Current=3uA, Manufacturer=Nichicon, Max Operating Temperature=105°C, Min Operating Temperature=-55°C, Package Quantity=500, Ripple Current=230mA, Supplier Part Number 1=493-2160-1-ND, Tolerance=20%, Voltage=6.3V, Category="Aluminum Electrolytic Capacitors", ComponentLink1Description=https://datasheet.ciiva.com/11776/0900766b80fa3a91-11776932.pdf?src-supplier=RSComponents, ComponentLink1URL=https://datasheet.ciiva.com/11776/0900766b80fa3a91-11776932.pdf?src-supplier=RSComponents, ComponentLink2Description=https://datasheet.ciiva.com/112/e-wt-112355.pdf?src-supplier=Digi-Key, ComponentLink2URL=https://datasheet.ciiva.com/112/e-wt-112355.pdf?src-supplier=Digi-Key, ComponentLink3Description=https://datasheet.ciiva.com/112/e-wt-112356.pdf?src-supplier=Digi-Key, ComponentLink3URL=https://datasheet.ciiva.com/112/e-wt-112356.pdf?src-supplier=Digi-Key, ComponentLink4Description=https://datasheet.ciiva.com/112/e-wt-112357.pdf?src-supplier=Digi-Key, ComponentLink4URL=https://datasheet.ciiva.com/112/e-wt-112357.pdf?src-supplier=Digi-Key, ComponentLink5Description=https://datasheet.ciiva.com/16502/e-wt-16502949.pdf?src-supplier=Future+Electronics, ComponentLink5URL=https://datasheet.ciiva.com/16502/e-wt-16502949.pdf?src-supplier=Future+Electronics, ComponentLink6Description=https://datasheet.ciiva.com/28458/1910938-28458373.pdf?src-supplier=Element14, ComponentLink6URL=https://datasheet.ciiva.com/28458/1910938-28458373.pdf?src-supplier=Element14, ComponentLink7Description=https://datasheet.ciiva.com/7793/e-wt-7793495.pdf?src-supplier=Element14, ComponentLink7URL=https://datasheet.ciiva.com/7793/e-wt-7793495.pdf?src-supplier=Element14, Diameter=8mm, Dissipation Factor=0.3%, Features="General Purpose", Height=10mm, Height - Seated (Max)=0.315inch, Lead Diameter=1.1mm, Lead Free="Lead Free", Lead Pitch=3.1mm, Length=10mm, Life (Hours)=1000Hour, Manufacturer Part Number=UWT0J102MNL1GS, Mount="Surface Mount", Number of Pins=2, Packaging="Tape and Reel", Pricing 1="1=0.45000, 10=0.31900, 50=0.24140, 100=0.21020 (USD)", Radiation Hardening=No, REACH SVHC="No SVHC", Ripple Current (AC)=230mA, RoHS=Yes, Stock 1=46922, Supplier 1=Digi-Key, Termination=SMD/SMT, Voltage Rating=6.3V, Voltage Rating (DC)=6.3V
CF10 CF11: library part ULR2G4R7MNL1GS, "CAP ALUM 4.7UF 20% 400V SMD", Case/Package=SMD/SMT, Leakage Current=100uA, Manufacturer=Nichicon, Max Operating Temperature=105°C, Min Operating Temperature=-40°C, Package Quantity=500, Ripple Current=35mA, Supplier Part Number 1=493-6709-1-ND, Tolerance=20%, Voltage=400V, Capacitance=4.7uF, Category="Aluminum Electrolytic Capacitors", ComponentLink1Description=https://datasheet.ciiva.com/6317/e-lr-6317191.pdf?src-supplier=Digi-Key, ComponentLink1URL=https://datasheet.ciiva.com/6317/e-lr-6317191.pdf?src-supplier=Digi-Key, ComponentLink2Description=https://datasheet.ciiva.com/6317/e-lr-6317193.pdf?src-supplier=Digi-Key, ComponentLink2URL=https://datasheet.ciiva.com/6317/e-lr-6317193.pdf?src-supplier=Digi-Key, Diameter=10mm, Dissipation Factor=0.25%, Height=10mm, Height - Seated (Max)=0.433inch, Lead Free="Lead Free", Lead Pitch=4.5mm, Length=10mm, Life (Hours)=3000Hour, Manufacturer Part Number=ULR2G4R7MNL1GS, Mount="Surface Mount", Packaging="Tape and Reel", Pricing 1="1=0.77000, 10=0.56900, 50=0.45540, 100=0.39030 (USD)", RoHS=Yes, Stock 1=108237, Supplier 1=Digi-Key, Termination=SMD/SMT, Voltage Rating=400V, Voltage Rating (DC)=400V
D1: "DIODE GEN PURP 600V 2A SMB", Average Rectified Current=1A, Case/Package=SMB, Forward Current=2A, Forward Voltage=1.25V, Manufacturer="ON Semiconductor", Max Forward Surge Current (Ifsm)=35A, Max Operating Temperature=175°C, Max Repetitive Reverse Voltage (Vrrm)=600V, Max Reverse Current=5uA, Min Operating Temperature=-65°C, Package Quantity=2500, Supplier Part Number 1=MURS160T3GOSCT-ND, Category="Rectifier Diodes", ComponentLink1Description=https://datasheet.ciiva.com/14169/tw601232-14169051.pdf?src-supplier=Distrelec, ComponentLink1URL=https://datasheet.ciiva.com/14169/tw601232-14169051.pdf?src-supplier=Distrelec, ComponentLink2Description=https://datasheet.ciiva.com/16470/murs120t3-d-16470453.pdf?src-supplier=Future+Electronics, ComponentLink2URL=https://datasheet.ciiva.com/16470/murs120t3-d-16470453.pdf?src-supplier=Future+Electronics, ComponentLink3Description=https://datasheet.ciiva.com/5763/murs120t3-d-5763111.pdf?src-supplier=Farnell, ComponentLink3URL=https://datasheet.ciiva.com/5763/murs120t3-d-5763111.pdf?src-supplier=Farnell, ComponentLink4Description=https://datasheet.ciiva.com/16474/murs120t3-d-16474392.pdf?src-supplier=Avnet+Asia, ComponentLink4URL=https://datasheet.ciiva.com/16474/murs120t3-d-16474392.pdf?src-supplier=Avnet+Asia, ComponentLink5Description=https://datasheet.ciiva.com/8294/murs120t3-d-8294553.pdf?src-supplier=Avnet, ComponentLink5URL=https://datasheet.ciiva.com/8294/murs120t3-d-8294553.pdf?src-supplier=Avnet, ComponentLink6Description=https://datasheet.ciiva.com/25950/murs120t3-d-25950042.pdf?src-supplier=Avnet+Europe, ComponentLink6URL=https://datasheet.ciiva.com/25950/murs120t3-d-25950042.pdf?src-supplier=Avnet+Europe, ComponentLink7Description=https://datasheet.ciiva.com/7962/murs120t3-d-7962876.pdf?src-supplier=Element14, ComponentLink7URL=https://datasheet.ciiva.com/7962/murs120t3-d-7962876.pdf?src-supplier=Element14, ComponentLink8Description=https://datasheet.ciiva.com/7962/murs120t3-d-7962877.pdf?src-supplier=Element14, ComponentLink8URL=https://datasheet.ciiva.com/7962/murs120t3-d-7962877.pdf?src-supplier=Element14, ComponentLink9Description=https://datasheet.ciiva.com/7962/murs120t3-d-7962878.pdf?src-supplier=Element14, ComponentLink9URL=https://datasheet.ciiva.com/7962/murs120t3-d-7962878.pdf?src-supplier=Element14, Contact Plating=Tin,Matte, Current Rating=1A, Element Configuration=Single, Halogen Free="Halogen Free", Height=2.13mm, Lead Free="Lead Free", Length=4.32mm, Manufacturer Part Number=MURS160T3G, Max Reverse Voltage (DC)=600V, Max Surge Current=35A, Number of Pins=2, Output Current=1A, Packaging="Tape and Reel", Peak Non-Repetitive Surge Current=35A, Polarity=Standard, Pricing 1="1=0.41000, 10=0.27700, 100=0.16350, 500=0.11066, 1000=0.08803 (USD)", Radiation Hardening=No, REACH SVHC="No SVHC", Recovery Time=75ns, Reverse Recovery Time=75ns, Reverse Voltage=600V, RoHS=Yes, Stock 1=315219, Supplier 1=Digi-Key, Termination=SMD/SMT, Voltage Rating (DC)=600V, Width=3.56mm
D2: "DIODE ZENER 4.3V 500MW SOD123", Case/Package=SOD-123-2, Forward Voltage=900mV, Manufacturer="ON Semiconductor", Manufacturer Part Number=MMSZ5229BT1G, Max Operating Temperature=150°C, Max Power Dissipation=500mW, Max Reverse Current=5uA, Min Operating Temperature=-55°C, Package Quantity=1, Supplier Part Number 1=MMSZ5229BT1GOSCT-ND, Test Current=20mA, Tolerance=5%, Voltage Rating (DC)=4.3V, Zener Current=10mA, Category="Zener Diodes", ComponentLink1Description=https://datasheet.ciiva.com/15142/getdatasheetpartid-88753-15142539.pdf?src-supplier=Verical, ComponentLink1URL=https://datasheet.ciiva.com/15142/getdatasheetpartid-88753-15142539.pdf?src-supplier=Verical, ComponentLink2Description=https://datasheet.ciiva.com/894/mmsz5221bt1-d-894935.pdf?src-supplier=Digi-Key, ComponentLink2URL=https://datasheet.ciiva.com/894/mmsz5221bt1-d-894935.pdf?src-supplier=Digi-Key, ComponentLink3Description=https://datasheet.ciiva.com/4731/mmsz5221bt1-d-4731591.pdf?src-supplier=Mouser, ComponentLink3URL=https://datasheet.ciiva.com/4731/mmsz5221bt1-d-4731591.pdf?src-supplier=Mouser, ComponentLink4Description=https://datasheet.ciiva.com/26093/mmsz5221bt1-d-26093031.pdf?src-supplier=Avnet+Europe, ComponentLink4URL=https://datasheet.ciiva.com/26093/mmsz5221bt1-d-26093031.pdf?src-supplier=Avnet+Europe, ComponentLink5Description=https://datasheet.ciiva.com/894/mmsz5221bt1-d-894936.pdf?src-supplier=Digi-Key, ComponentLink5URL=https://datasheet.ciiva.com/894/mmsz5221bt1-d-894936.pdf?src-supplier=Digi-Key, ComponentLink6Description=https://datasheet.ciiva.com/8346/mmsz5221bt1-d-8346200.pdf?src-supplier=Avnet, ComponentLink6URL=https://datasheet.ciiva.com/8346/mmsz5221bt1-d-8346200.pdf?src-supplier=Avnet, ComponentLink7Description=https://datasheet.ciiva.com/894/mmsz5221bt1-d-894937.pdf?src-supplier=Digi-Key, ComponentLink7URL=https://datasheet.ciiva.com/894/mmsz5221bt1-d-894937.pdf?src-supplier=Digi-Key, ComponentLink8Description=https://datasheet.ciiva.com/8348/mmsz5221bt1-d-8348107.pdf?src-supplier=Avnet, ComponentLink8URL=https://datasheet.ciiva.com/8348/mmsz5221bt1-d-8348107.pdf?src-supplier=Avnet, ComponentLink9Description=https://datasheet.ciiva.com/16463/mmsz5221bt1-d-16463245.pdf?src-supplier=Future+Electronics, ComponentLink9URL=https://datasheet.ciiva.com/16463/mmsz5221bt1-d-16463245.pdf?src-supplier=Future+Electronics, ComponentLink10Description=https://datasheet.ciiva.com/16473/mmsz5221bt1-d-16473405.pdf?src-supplier=Avnet+Asia, ComponentLink10URL=https://datasheet.ciiva.com/16473/mmsz5221bt1-d-16473405.pdf?src-supplier=Avnet+Asia, ComponentLink11Description=https://datasheet.ciiva.com/22697/86126-22697917.pdf?src-supplier=Element14, ComponentLink11URL=https://datasheet.ciiva.com/22697/86126-22697917.pdf?src-supplier=Element14, ComponentLink12Description=https://datasheet.ciiva.com/8026/86126-8026846.pdf?src-supplier=Element14, ComponentLink12URL=https://datasheet.ciiva.com/8026/86126-8026846.pdf?src-supplier=Element14, Contact Plating=Tin,Matte, Element Configuration=Single, ESD Protection=Yes, Height=1.12mm, Impedance=22R, Lead Free="Lead Free", Length=2.69mm, Material=Plastic, Max Reverse Leakage Current=5uA, Number of Pins=2, Packaging="Tape and Reel", Power Dissipation=500mW, Power Rating=500mW, Pricing 1="1=0.21000, 10=0.18400, 100=0.08670, 500=0.05146, 1000=0.03381 (USD)", Radiation Hardening=No, REACH SVHC="No SVHC", RoHS=Yes, Stock 1=9037, Supplier 1=Digi-Key, Termination=SMD/SMT, Voltage Tolerance=5%, Width=1.6mm, Working Voltage=4.3V, Zener Voltage=4.3V
D3: "DIODE GEN PURP 100V 200MA SOD123", Average Rectified Current=200mA, Capacitance=4pF, Case/Package=SOD-123-2, Current Rating=200A, Forward Voltage=1V, Manufacturer="ON Semiconductor", Max Forward Surge Current (Ifsm)=2A, Max Operating Temperature=150°C, Max Repetitive Reverse Voltage (Vrrm)=100V, Max Reverse Current=5uA, Min Operating Temperature=-55°C, Package Quantity=1, Power Dissipation=425mW, Supplier Part Number 1=MMSD4148T1GOSCT-ND, Category="Rectifier Diodes", ComponentLink1Description=https://datasheet.ciiva.com/22663/1707241-22663688.pdf?src-supplier=Element14, ComponentLink1URL=https://datasheet.ciiva.com/22663/1707241-22663688.pdf?src-supplier=Element14, ComponentLink2Description=https://datasheet.ciiva.com/8294/mmsd4148t1-d-8294902.pdf?src-supplier=Avnet, ComponentLink2URL=https://datasheet.ciiva.com/8294/mmsd4148t1-d-8294902.pdf?src-supplier=Avnet, ComponentLink3Description=https://datasheet.ciiva.com/915/mmsd4148t1-d-915383.pdf?src-supplier=Digi-Key, ComponentLink3URL=https://datasheet.ciiva.com/915/mmsd4148t1-d-915383.pdf?src-supplier=Digi-Key, ComponentLink4Description=https://datasheet.ciiva.com/16474/mmsd4148t1-d-16474311.pdf?src-supplier=Avnet+Asia, ComponentLink4URL=https://datasheet.ciiva.com/16474/mmsd4148t1-d-16474311.pdf?src-supplier=Avnet+Asia, ComponentLink5Description=https://datasheet.ciiva.com/915/mmsd4148t1-d-915384.pdf?src-supplier=Digi-Key, ComponentLink5URL=https://datasheet.ciiva.com/915/mmsd4148t1-d-915384.pdf?src-supplier=Digi-Key, ComponentLink6Description=https://datasheet.ciiva.com/915/mmsd4148t1-d-915385.pdf?src-supplier=Digi-Key, ComponentLink6URL=https://datasheet.ciiva.com/915/mmsd4148t1-d-915385.pdf?src-supplier=Digi-Key, ComponentLink7Description=https://datasheet.ciiva.com/16368/mmsd4148t1-d-16368570.pdf?src-supplier=Future+Electronics, ComponentLink7URL=https://datasheet.ciiva.com/16368/mmsd4148t1-d-16368570.pdf?src-supplier=Future+Electronics, ComponentLink8Description=https://datasheet.ciiva.com/8299/mmsd4148t1-d-8299883.pdf?src-supplier=Avnet, ComponentLink8URL=https://datasheet.ciiva.com/8299/mmsd4148t1-d-8299883.pdf?src-supplier=Avnet, ComponentLink9Description=https://datasheet.ciiva.com/25947/mmsd4148t1-d-25947947.pdf?src-supplier=Avnet+Europe, ComponentLink9URL=https://datasheet.ciiva.com/25947/mmsd4148t1-d-25947947.pdf?src-supplier=Avnet+Europe, ComponentLink10Description=https://datasheet.ciiva.com/8053/mmsd4148t1-d-8053692.pdf?src-supplier=Element14, ComponentLink10URL=https://datasheet.ciiva.com/8053/mmsd4148t1-d-8053692.pdf?src-supplier=Element14, ComponentLink11Description=https://datasheet.ciiva.com/8053/mmsd4148t1-d-8053693.pdf?src-supplier=Element14, ComponentLink11URL=https://datasheet.ciiva.com/8053/mmsd4148t1-d-8053693.pdf?src-supplier=Element14, ComponentLink12Description=https://datasheet.ciiva.com/15144/getdatasheetpartid-78734-15144509.pdf?src-supplier=Verical, ComponentLink12URL=https://datasheet.ciiva.com/15144/getdatasheetpartid-78734-15144509.pdf?src-supplier=Verical, Contact Plating=Tin,Matte, Element Configuration=Single, Forward Current=200mA, Halogen Free="Halogen Free", Height=1.12mm, Lead Free="Lead Free", Length=2.69mm, Manufacturer Part Number=MMSD4148T1G, Max Reverse Leakage Current=5uA, Max Reverse Voltage (DC)=100V, Max Surge Current=2A, Number of Pins=2, Output Current=200mA, Packaging="Tape and Reel", Peak Non-Repetitive Surge Current=2A, Polarity=Standard, Pricing 1="1=0.13000, 10=0.11100, 100=0.04270, 500=0.03116, 1000=0.02092 (USD)", Radiation Hardening=No, REACH SVHC="No SVHC", Recovery Time=4ns, Reverse Recovery Time=4ns, RoHS=Yes, Stock 1=208512, Supplier 1=Digi-Key, Voltage Rating (DC)=100V, Width=1.6mm
D4: "DIODE SCHOTTKY 30V 1A SOD123W", Average Rectified Current=1A, Forward Voltage=360mV, Manufacturer="NXP Semiconductors", Max Operating Temperature=150°C, Max Power Dissipation=570mW, Max Repetitive Reverse Voltage (Vrrm)=30V, Max Reverse Leakage Current=1.5mA, Max Surge Current=50A, Min Operating Temperature=-55°C, Package Quantity=1, Supplier Part Number 1=1727-5201-6-ND, ComponentLink1Description=https://datasheet.ciiva.com/4715/pmeg3010er-117881-4715350.pdf, ComponentLink1URL=https://datasheet.ciiva.com/4715/pmeg3010er-117881-4715350.pdf, ComponentLink2Description=https://datasheet.ciiva.com/8299/pmeg3010er-8299296.pdf, ComponentLink2URL=https://datasheet.ciiva.com/8299/pmeg3010er-8299296.pdf, ComponentLink3Description=https://datasheet.ciiva.com/913/pmeg3010er-913784.pdf, ComponentLink3URL=https://datasheet.ciiva.com/913/pmeg3010er-913784.pdf, ComponentLink4Description=https://datasheet.ciiva.com/8294/pmeg3010er-8294409.pdf, ComponentLink4URL=https://datasheet.ciiva.com/8294/pmeg3010er-8294409.pdf, ComponentLink5Description=https://datasheet.ciiva.com/913/pmeg3010er-913782.pdf, ComponentLink5URL=https://datasheet.ciiva.com/913/pmeg3010er-913782.pdf, ComponentLink6Description=https://datasheet.ciiva.com/913/pmeg3010er-913783.pdf, ComponentLink6URL=https://datasheet.ciiva.com/913/pmeg3010er-913783.pdf, Element Configuration=Single, Forward Current=1A, Lead Free="Lead Free", Manufacturer Part Number=PMEG3010ER,115, Max Reverse Voltage (DC)=30V, Mount="Surface Mount", Number of Pins=2, Packaging="Tape and Reel", Peak Non-Repetitive Surge Current=50A, Peak Reverse Current=1.5mA, Pricing 1="1=0.38, 10=0.305, 100=0.2076, 500=0.1557, 1000=0.1168 (USD)", Radiation Hardening=No, Stock 1=2796, Supplier 1=Digi-Key
DF1: "DIODE SCHOTTKY 60V 3A SMC", Average Rectified Current=3A, Case/Package=SMC, Forward Voltage=740mV, Manufacturer="ON Semiconductor", Max Forward Surge Current (Ifsm)=125A, Max Operating Temperature=175°C, Max Repetitive Reverse Voltage (Vrrm)=60V, Max Reverse Current=150uA, Min Operating Temperature=-65°C, Package Quantity=2500, Supplier Part Number 1=MBRS360T3GOSCT-ND, Category="Schottky Diodes", ComponentLink1Description=https://datasheet.ciiva.com/34301/866314-34301618.pdf?src-supplier=Jameco, ComponentLink1URL=https://datasheet.ciiva.com/34301/866314-34301618.pdf?src-supplier=Jameco, ComponentLink2Description=https://datasheet.ciiva.com/25954/mbrs360t3-d-25954259.pdf?src-supplier=Avnet+Europe, ComponentLink2URL=https://datasheet.ciiva.com/25954/mbrs360t3-d-25954259.pdf?src-supplier=Avnet+Europe, ComponentLink3Description=https://datasheet.ciiva.com/26788/mbrs360t3g-26788572.pdf?src-supplier=IIIC, ComponentLink3URL=https://datasheet.ciiva.com/26788/mbrs360t3g-26788572.pdf?src-supplier=IIIC, ComponentLink4Description=https://datasheet.ciiva.com/916/mbrs360t3-d-916052.pdf?src-supplier=Digi-Key, ComponentLink4URL=https://datasheet.ciiva.com/916/mbrs360t3-d-916052.pdf?src-supplier=Digi-Key, ComponentLink5Description=https://datasheet.ciiva.com/916/mbrs360t3-d-916053.pdf?src-supplier=Digi-Key, ComponentLink5URL=https://datasheet.ciiva.com/916/mbrs360t3-d-916053.pdf?src-supplier=Digi-Key, ComponentLink6Description=https://datasheet.ciiva.com/916/mbrs360t3-d-916054.pdf?src-supplier=Digi-Key, ComponentLink6URL=https://datasheet.ciiva.com/916/mbrs360t3-d-916054.pdf?src-supplier=Digi-Key, ComponentLink7Description=https://datasheet.ciiva.com/8299/mbrs360t3-d-8299863.pdf?src-supplier=Avnet, ComponentLink7URL=https://datasheet.ciiva.com/8299/mbrs360t3-d-8299863.pdf?src-supplier=Avnet, ComponentLink8Description=https://datasheet.ciiva.com/28655/mbrs360t3-d-28655799.pdf?src-supplier=Element14, ComponentLink8URL=https://datasheet.ciiva.com/28655/mbrs360t3-d-28655799.pdf?src-supplier=Element14, ComponentLink9Description=https://datasheet.ciiva.com/22659/1806490-22659080.pdf?src-supplier=Element14, ComponentLink9URL=https://datasheet.ciiva.com/22659/1806490-22659080.pdf?src-supplier=Element14, ComponentLink10Description=https://datasheet.ciiva.com/5763/mbrs360t3-d-5763035.pdf?src-supplier=Farnell, ComponentLink10URL=https://datasheet.ciiva.com/5763/mbrs360t3-d-5763035.pdf?src-supplier=Farnell, ComponentLink11Description=https://datasheet.ciiva.com/8294/mbrs360t3-d-8294987.pdf?src-supplier=Avnet, ComponentLink11URL=https://datasheet.ciiva.com/8294/mbrs360t3-d-8294987.pdf?src-supplier=Avnet, ComponentLink12Description=https://datasheet.ciiva.com/16475/mbrs360t3-d-16475163.pdf?src-supplier=Avnet+Asia, ComponentLink12URL=https://datasheet.ciiva.com/16475/mbrs360t3-d-16475163.pdf?src-supplier=Avnet+Asia, ComponentLink13Description=https://datasheet.ciiva.com/7962/mbrs360t3-d-7962828.pdf?src-supplier=Element14, ComponentLink13URL=https://datasheet.ciiva.com/7962/mbrs360t3-d-7962828.pdf?src-supplier=Element14, ComponentLink14Description=https://datasheet.ciiva.com/7962/mbrs360t3-d-7962829.pdf?src-supplier=Element14, ComponentLink14URL=https://datasheet.ciiva.com/7962/mbrs360t3-d-7962829.pdf?src-supplier=Element14, ComponentLink15Description=https://datasheet.ciiva.com/7962/mbrs360t3-d-7962830.pdf?src-supplier=Element14, ComponentLink15URL=https://datasheet.ciiva.com/7962/mbrs360t3-d-7962830.pdf?src-supplier=Element14, Contact Plating=Tin,Matte, Current Rating=3A, Element Configuration=Single, Forward Current=3A, Halogen Free="Halogen Free", Height=2.13mm, Lead Free="Lead Free", Length=6.86mm, Manufacturer Part Number=MBRS360T3G, Max Reverse Leakage Current=150uA, Max Reverse Voltage (DC)=60V, Max Surge Current=125A, Number of Pins=2, Output Current=3A, Packaging="Tape and Reel", Peak Non-Repetitive Surge Current=125A, Polarity=Standard, Pricing 1="1=0.47000, 10=0.34700, 100=0.24180, 500=0.15314, 1000=0.12493 (USD)", Radiation Hardening=No, REACH SVHC="No SVHC", RoHS=Yes, Stock 1=113534, Supplier 1=Digi-Key, Termination=SMD/SMT, Voltage Rating (DC)=60V, Width=5.84mm
DF4: "RECT BRIDGE GPP 1A 400V DFS", Average Rectified Current=1A, Case/Package=SMD/SMT, Forward Voltage=1.1V, Manufacturer=Diodes, Max Forward Surge Current (Ifsm)=50A, Max Operating Temperature=150°C, Max Repetitive Reverse Voltage (Vrrm)=400V, Max Reverse Current=10uA, Min Operating Temperature=-65°C, Package Quantity=1, Reverse Voltage (DC)=280V, Supplier Part Number 1=60AC8755, Category="Rectifier Diodes", ComponentLink1Description=https://datasheet.ciiva.com/34302/1540050-34302383.pdf?src-supplier=Jameco, ComponentLink1URL=https://datasheet.ciiva.com/34302/1540050-34302383.pdf?src-supplier=Jameco, ComponentLink2Description=https://datasheet.ciiva.com/26788/df04s-t-26788074.pdf?src-supplier=IIIC, ComponentLink2URL=https://datasheet.ciiva.com/26788/df04s-t-26788074.pdf?src-supplier=IIIC, ComponentLink3Description=https://datasheet.ciiva.com/25958/ds17001-25958714.pdf?src-supplier=Avnet+Europe, ComponentLink3URL=https://datasheet.ciiva.com/25958/ds17001-25958714.pdf?src-supplier=Avnet+Europe, ComponentLink4Description=https://datasheet.ciiva.com/11195/ds17001-11195727.pdf?src-supplier=Avnet, ComponentLink4URL=https://datasheet.ciiva.com/11195/ds17001-11195727.pdf?src-supplier=Avnet, Element Configuration=Single, Forward Current=1A, Height=3.4mm, Lead Free="Lead Free", Length=8.51mm, Manufacturer Part Number=DF04S-T, Max Surge Current=50A, Mount="Surface Mount", Number of Elements=1, Number of Pins=4, Packaging="Tape and Reel", Peak Non-Repetitive Surge Current=50A, Radiation Hardening=No, RoHS=Yes, Supplier 1=Newark, Termination=SMD/SMT, Weight=0.010547oz, Width=6.5mm